# Altium PCB NB3000XN.PcbDoc (part 59 of 71)
Units mil, origin at the board's own origin, x right, y up, seen from the top; angles counter-clockwise.
Board outline 9527.56 x 6929.77 mil, 6 copper layers (Top Layer, GND+SHIELD, MidLayer1, MidLayer2, P2 - 3V3+5V0, Bottom Layer), stack 62.375 mil thick; 832 components, 1027 nets, 4655 pads, 4981 vias.
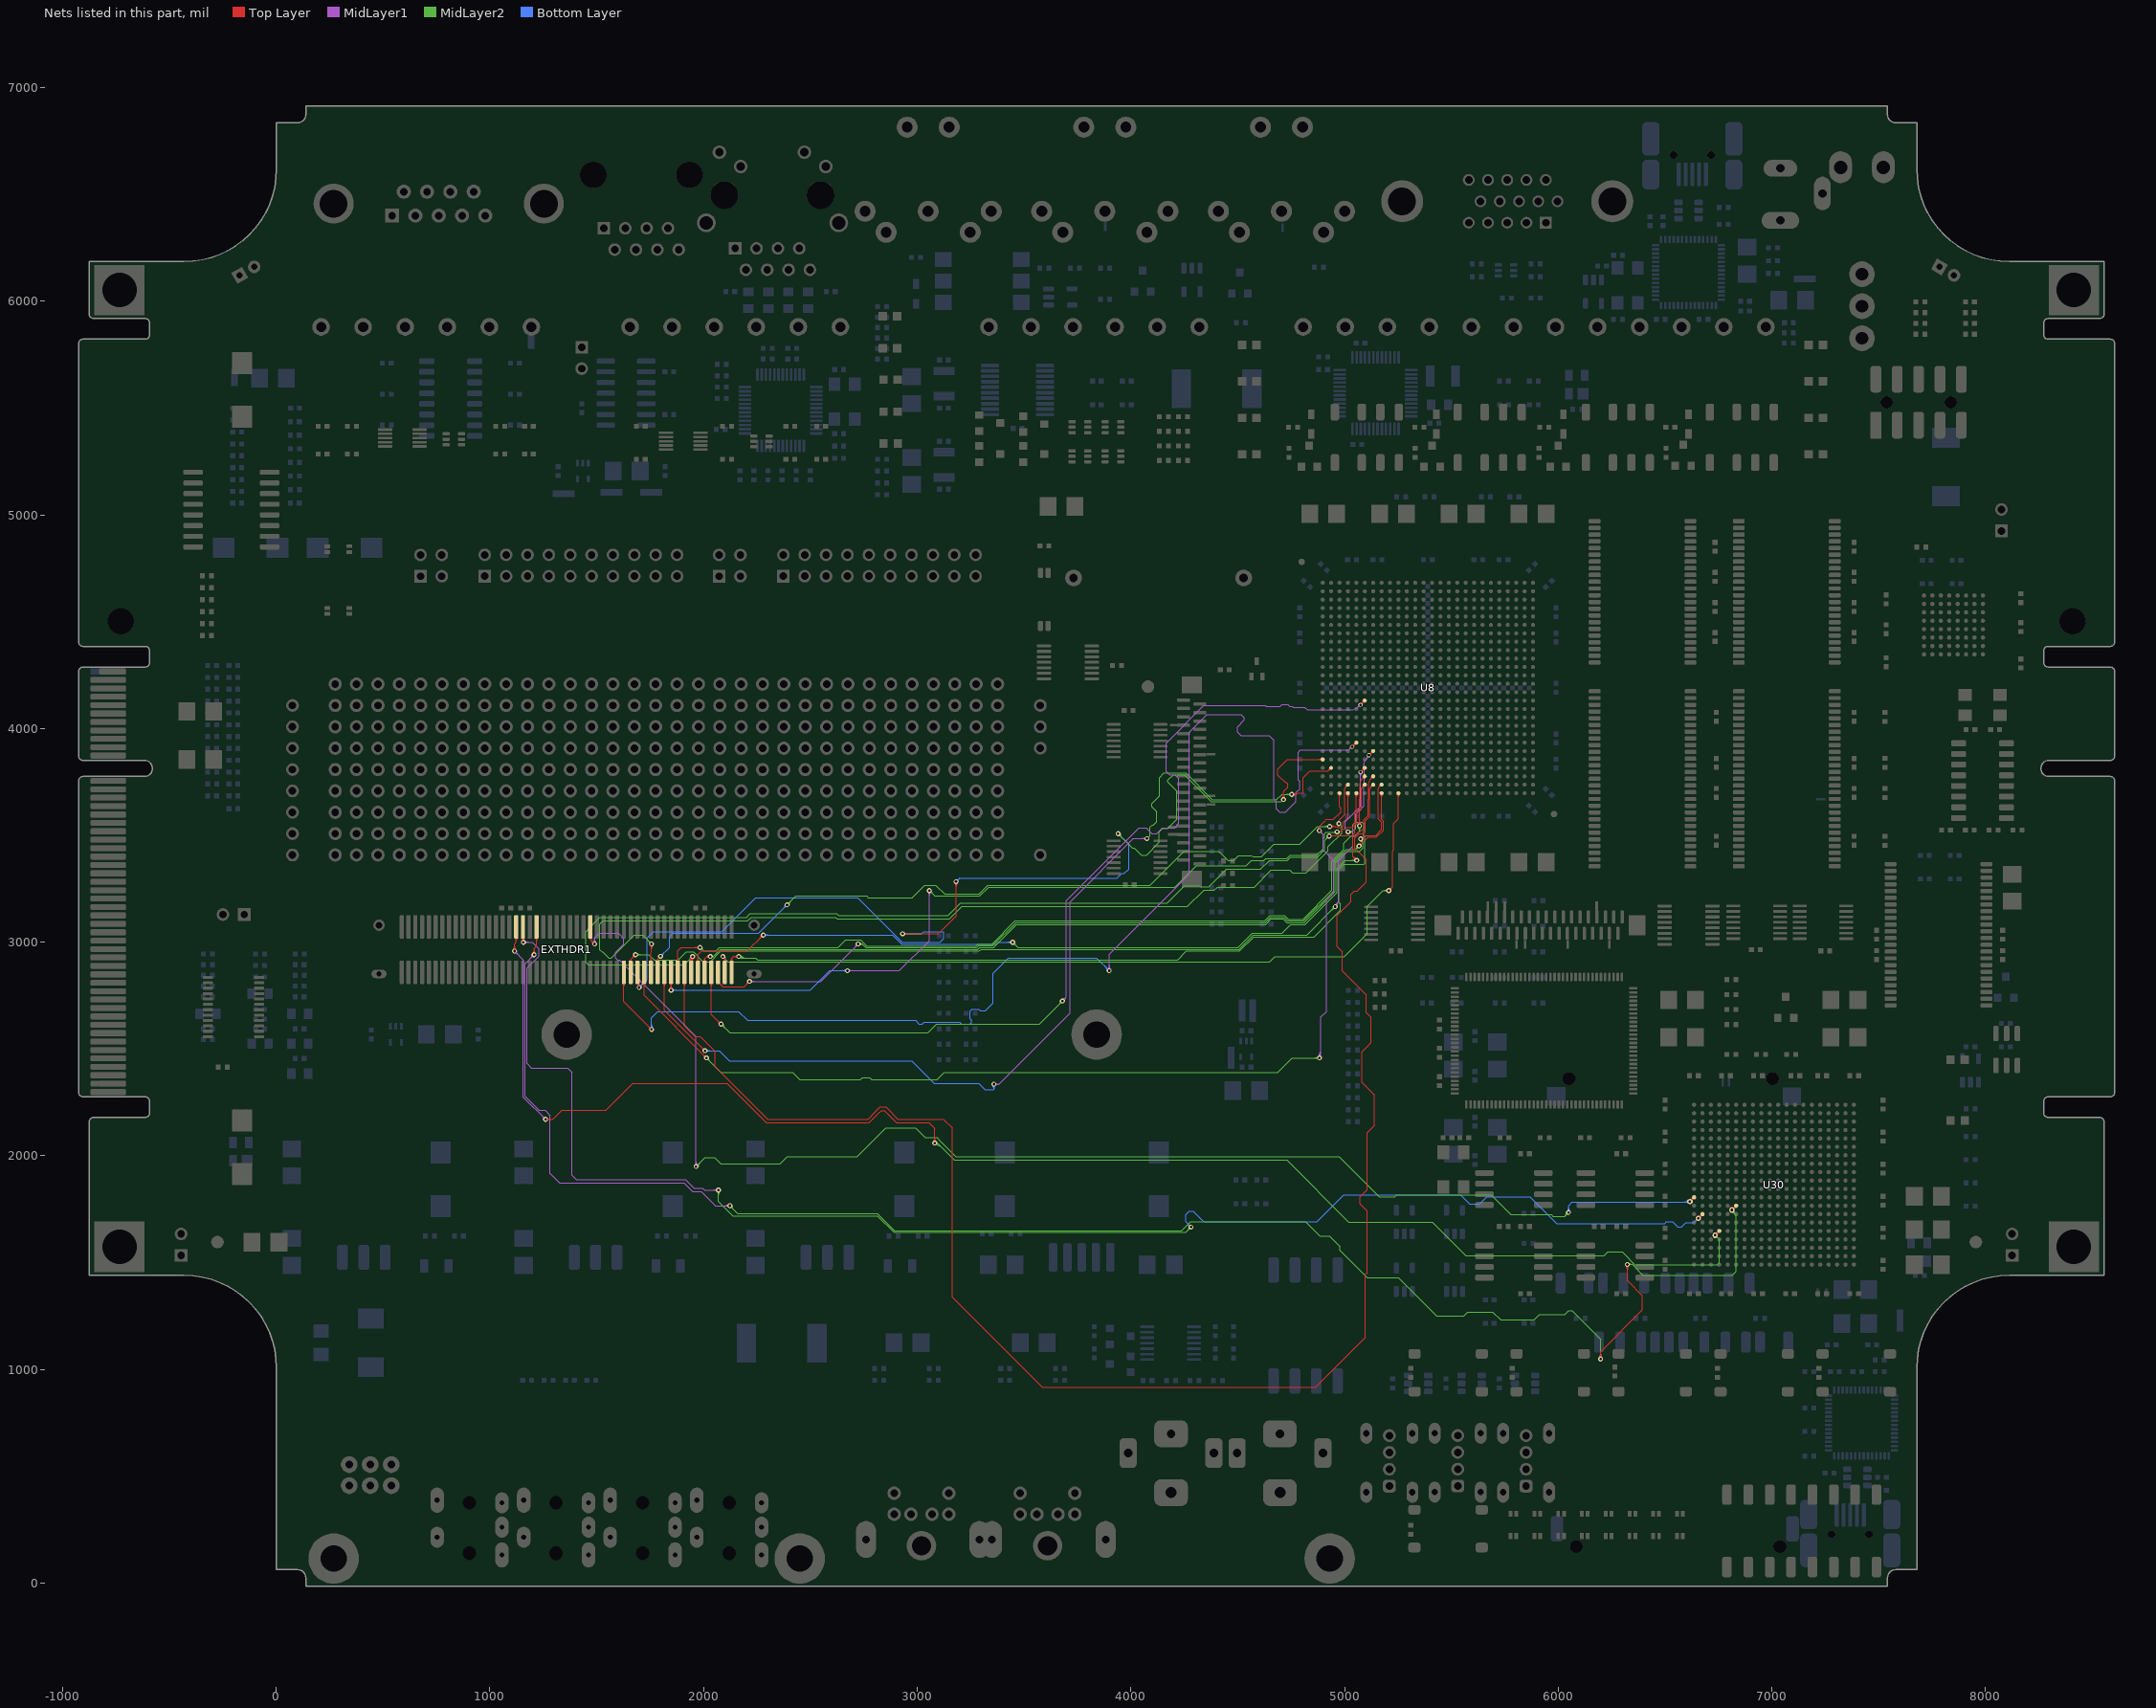
[diagram p63: the nets of this part, all layers, seen from the top]

## Via types
v1: diameter 23, hole 11.81, Top Layer to Bottom Layer, 3672 vias
v2: diameter 26, hole 11.81, Top Layer to Bottom Layer, 461 vias
v3: diameter 19, hole 11.81, Top Layer to Bottom Layer, tented both sides, 396 vias
v4: diameter 23.62, hole 11.81, Top Layer to Bottom Layer, 288 vias
v5: diameter 20, hole 11.81, Top Layer to Bottom Layer, 91 vias
v6: diameter 23, hole 11.81, Top Layer to Bottom Layer, tented both sides, 50 vias
v7: diameter 31, hole 11.81, Top Layer to Bottom Layer, 15 vias
v8: diameter 27.56, hole 11.81, Top Layer to Bottom Layer, tented both sides, 4 vias
v9: diameter 29, hole 11.81, Top Layer to Bottom Layer, 3 vias
v10: diameter 21, hole 11.81, Top Layer to Bottom Layer, 1 vias

## Nets (pads, with @x,y where several pads share a name; then routed paths per layer and width w, separated by ;. In a path a pad name is that pad's centre, name@x,y a point inside that pad or via, vN(x,y) a via of type N, cw(c..) or ccw(c..) an arc to the next point about the centre after c; other vN are vias at no path point) (continued)
PBCTRL.SPARE3: EXTHDR1.43 U30.Y12 | length 7040.8
  Top Layer w4: EXTHDR1.43@1466.36,3019.56 cw(c1460.65,3008.02) 1473.52,3008.02 ; EXTHDR1.43@1468.13,3023.14 cw(c1463.84,3014.46) 1473.52,3014.46 ; EXTHDR1.43@1469.9,3071.85 1469.91,3075.04 1473.52,3075.04 1473.52,3008.37 v1(1490.19,2991.71) ; 1473.52,3016.16 cw(c1480.48,3016.16) EXTHDR1.43@1475.56,3021.07 ; v1@1480.69,2991.71 ccw(c1457.76,2991.71) 1473.97,3007.93 ccw(c1490.19,3024.14) v1@1490.19,3001.21 ; v1@1484.69,2991.71 ccw(c1471.41,2991.71) 1480.8,3001.1 ccw(c1490.19,3010.49) v1@1490.19,2997.21
  Top Layer w8: v2(6616.3,1786.26) U30.Y12@6635.98,1805.94 ; v2@6616.3,1795.26 ccw(c6616.3,1816.99) 6631.66,1801.62 ccw(c6647.03,1786.26) v2@6625.3,1786.26 ; U30.Y12@6630.14,1805.94 cw(c6616.04,1805.94) 6626.01,1795.97 cw(c6635.98,1786) U30.Y12@6635.98,1800.1
  MidLayer1 w4: v1@1483.47,2998.43 ccw(c1467.26,3014.64) 1490.19,3014.64 ccw(c1513.13,3014.64) v1@1496.91,2998.43 ; v1@1486.3,2995.6 ccw(c1476.91,3004.99) 1490.19,3004.99 ccw(c1503.47,3004.99) v1@1494.08,2995.6 ; v1(1490.19,2991.71) 1490.19,3019 1513.19,3042 1600.6,3042 1627.39,3015.22 1627.39,2991.9 1589.19,2953.71 1589.19,2925 1597.48,2916.71 1606.86,2916.71 1965.19,2558.37 v1(1965.19,1950.04) ; v1@1958.47,1956.76 ccw(c1942.26,1972.98) 1965.19,1972.98 ccw(c1988.13,1972.98) v1@1971.91,1956.76 ; v1@1961.3,1953.93 ccw(c1951.91,1963.32) 1965.19,1963.32 ccw(c1978.47,1963.32) v1@1969.08,1953.93
  MidLayer2 w4: v1(1965.19,1950.04) 2006.86,1991.71 2052.02,1991.71 2081.73,1962 2358.27,1962 2393.08,1996.81 2719.94,1996.81 2854.13,2131 2992.56,2131 3038.06,2085.5 3092.42,2085.5 3107.36,2070.56 3181.11,1996.81 4974.77,1996.81 5163.21,1808.37 5235.45,1808.37 5243.78,1816.71 5615.19,1816.71 5687.21,1816.71 5778.88,1725.04 5967.56,1725.04 5975.9,1716.71 6030.19,1716.71 v1(6048.52,1735.04) ; v1@1965.19,1955.54 ccw(c1965.19,1968.82) 1974.58,1959.43 ccw(c1983.97,1950.04) v1@1970.69,1950.04 ; v1@1965.19,1959.54 ccw(c1965.19,1982.48) 1981.41,1966.26 ccw(c1997.63,1950.04) v1@1974.69,1950.04 ; v1@6039.02,1735.04 cw(c6016.09,1735.04) 6032.31,1718.82 cw(c6048.52,1702.61) v1@6048.52,1725.54 ; v1@6043.02,1735.04 cw(c6029.75,1735.04) 6039.13,1725.65 cw(c6048.52,1716.26) v1@6048.52,1729.54
  Bottom Layer w4: v1@6041.81,1741.76 ccw(c6025.59,1757.98) 6048.52,1757.98 ccw(c6071.46,1757.98) v1@6055.24,1741.76 ; v1@6044.64,1738.93 ccw(c6035.25,1748.32) 6048.52,1748.32 ccw(c6061.8,1748.32) v1@6052.41,1738.93 ; v1(6048.52,1735.04) 6048.52,1766.71 6065.19,1783.37 6606.86,1783.37 6615.19,1791.71 6616.3,1791.71 v2(6616.3,1786.26) ; 6582.78,1783.37 ccw(c6582.78,1819.78) v2@6608.52,1794.04 ; 6592.43,1783.37 ccw(c6592.43,1810.12) v2@6611.35,1791.21 ; 6596.71,1783.37 cw(c6596.71,1766.67) v2@6608.52,1778.48 ; 6602.09,1783.37 ccw(c6602.09,1800.47) v2@6614.18,1788.38
PBCTRL.SPARE4: EXTHDR1.65 U30.U16 | length 7661.4
  Top Layer w4: v1@1108.47,2965.09 ccw(c1092.26,2981.31) 1115.19,2981.31 ccw(c1138.13,2981.31) v1@1121.91,2965.09 ; v1@1111.3,2962.26 ccw(c1101.91,2971.65) 1115.19,2971.65 ccw(c1128.47,2971.65) v1@1119.08,2962.26 ; v1(1115.19,2958.37) 1115.19,2990.37 1123.45,2998.63 EXTHDR1.65@1123.45,3071.85 ; EXTHDR1.65@1117.79,3021.07 cw(c1104.13,3007.42) 1123.45,3007.42 cw(c1142.76,3007.42) EXTHDR1.65@1129.1,3021.07 ; v1(1260.86,2171.04) 1294.73,2171.04 1336.69,2213 1543,2213 1669,2339 2111,2339 2128.68,2321.32 2294,2156 2776.25,2156 2822.5,2202.25 2832.75,2212.5 2847.25,2212.5 2903.75,2156 3054,2156 3081.86,2128.14 v1(3081.86,2060) ; v1@1264.75,2167.15 cw(c1274.14,2157.76) 1274.14,2171.04 cw(c1274.14,2184.32) v1@1264.75,2174.93 ; v1@1267.57,2164.32 cw(c1283.79,2148.11) 1283.79,2171.04 cw(c1283.79,2193.98) v1@1267.57,2177.76 ; v1@3075.14,2066.72 ccw(c3058.92,2082.93) 3081.86,2082.93 ccw(c3104.79,2082.93) v1@3088.57,2066.72 ; v1@3077.97,2063.89 ccw(c3068.58,2073.28) 3081.86,2073.28 ccw(c3095.14,2073.28) v1@3085.75,2063.89
  Top Layer w8: v2(6734.41,1628.78) U30.U16@6754.09,1648.46 ; v2@6734.41,1637.78 ccw(c6734.41,1659.51) 6749.77,1644.14 ccw(c6765.14,1628.78) v2@6743.41,1628.78 ; U30.U16@6748.25,1648.46 cw(c6734.15,1648.46) 6744.12,1638.49 cw(c6754.09,1628.52) U30.U16@6754.09,1642.62
  MidLayer1 w4: v1@1115.19,2948.87 cw(c1115.19,2925.94) 1131.41,2942.16 cw(c1147.63,2958.37) v1@1124.69,2958.37 ; v1@1115.19,2952.87 cw(c1115.19,2939.6) 1124.58,2948.99 cw(c1133.97,2958.37) v1@1120.69,2958.37 ; v1(1115.19,2958.37) 1156.86,2916.71 1156.86,2275.04 v1(1260.86,2171.04) ; v1@1251.36,2171.04 ccw(c1228.42,2171.04) 1244.64,2187.26 ccw(c1260.86,2203.48) v1@1260.86,2180.54 ; v1@1255.36,2171.04 ccw(c1242.08,2171.04) 1251.47,2180.43 ccw(c1260.86,2189.82) v1@1260.86,2176.54
  MidLayer2 w4: v1@3081.86,2050.5 cw(c3081.86,1995.13) 3121.01,2034.28 ; v1@3081.86,2054.5 cw(c3081.86,2008.79) 3114.18,2041.11 ; v1@3081.86,2058.5 cw(c3081.86,2022.44) 3107.35,2047.94 ; v1(3081.86,2060) 3095.29,2060 3174.48,1980.81 4729.68,1980.81 5019.78,1690.71 5411.45,1690.71 5568.78,1533.37 6214.19,1533.37 6231.86,1551.04 6299.19,1551.04 6358.86,1491.37 6745.86,1491.37 6754.52,1500.04 6754.52,1608.66 v2(6734.41,1628.78) ; v1@3081.86,2062.5 cw(c3081.86,2036.1) 3100.52,2054.77 ; v1@3081.86,2066.5 cw(c3081.86,2049.76) 3093.7,2061.6
PBCTRL.SPI_CS_N0: EXTHDR1.59 U30.R13 | length 8673.8
  Top Layer w4: v1@1200.14,2948.43 ccw(c1183.92,2964.64) 1206.86,2964.64 ccw(c1229.79,2964.64) v1@1213.57,2948.43 ; v1@1202.97,2945.6 ccw(c1193.58,2954.99) 1206.86,2954.99 ccw(c1220.14,2954.99) v1@1210.75,2945.6 ; v1(1206.86,2941.71) 1206.86,2970 1217.94,2981.08 EXTHDR1.59@1217.94,3071.85 ; EXTHDR1.59@1212.28,3021.07 cw(c1198.62,3007.42) 1217.94,3007.42 cw(c1237.25,3007.42) EXTHDR1.59@1223.59,3021.07 ; v1@6191.81,1055.76 ccw(c6175.59,1071.98) 6198.52,1071.98 ccw(c6221.46,1071.98) v1@6205.24,1055.76 ; v1@6194.64,1052.93 ccw(c6185.25,1062.32) 6198.52,1062.32 ccw(c6211.8,1062.32) v1@6202.41,1052.93 ; v1(6198.52,1049.04) 6198.52,1083.37 6395,1279.85 6395,1345 6323.52,1416.48 v1(6323.52,1491.71) ; v1@6316.81,1484.99 cw(c6300.59,1468.77) 6323.52,1468.77 cw(c6346.46,1468.77) v1@6330.24,1484.99 ; v1@6319.64,1487.82 cw(c6310.25,1478.43) 6323.52,1478.43 cw(c6336.8,1478.43) v1@6327.41,1487.82
  Top Layer w8: v2(6813.15,1746.89) U30.R13@6832.83,1766.57 ; v2@6813.15,1755.89 ccw(c6813.15,1777.62) 6828.51,1762.25 ccw(c6843.88,1746.89) v2@6822.15,1746.89 ; U30.R13@6826.99,1766.57 cw(c6812.89,1766.57) 6822.86,1756.6 cw(c6832.83,1746.63) U30.R13@6832.83,1760.73
  MidLayer1 w4: v1@1197.36,2941.71 cw(c1174.42,2941.71) 1190.64,2925.49 cw(c1206.86,2909.27) v1@1206.86,2932.21 ; v1@1201.36,2941.71 cw(c1188.08,2941.71) 1197.47,2932.32 cw(c1206.86,2922.93) v1@1206.86,2936.21 ; v1(1206.86,2941.71) 1164.86,2899.71 1164.86,2278.35 1230,2213.21 1258.65,2213.21 1281.86,2190 1281.86,1916.71 1283.26,1915.3 1325.57,1873 1908.31,1873 1948.31,1833 1990.02,1833 2056.31,1766.71 v1(2123.52,1766.71) ; v1@2116.81,1759.99 ccw(c2100.59,1743.77) 2100.59,1766.71 ccw(c2100.59,1789.64) v1@2116.81,1773.43 ; v1@2119.64,1762.82 ccw(c2110.25,1753.43) 2110.25,1766.71 ccw(c2110.25,1779.99) v1@2119.64,1770.6
  MidLayer2 w4: v1@2123.52,1757.21 cw(c2123.52,1734.27) 2139.74,1750.49 cw(c2155.96,1766.71) v1@2133.02,1766.71 ; v1@2123.52,1761.21 cw(c2123.52,1747.93) 2132.91,1757.32 cw(c2142.3,1766.71) v1@2129.02,1766.71 ; v1(2123.52,1766.71) 2160.23,1730 2813.69,1730 2893.69,1650 4238.29,1650 4280,1691.71 4818.17,1691.71 4884.84,1625.04 4929.96,1625.04 4979.38,1575.62 4979.38,1557.16 5106.54,1430 5251.9,1430 5270.69,1411.21 5431.86,1250.04 5558.22,1250.04 5577.46,1269.29 5693.57,1269.29 5730.65,1232.21 5888.06,1232.21 5913.06,1257.21 6030.69,1257.21 6048.52,1275.04 6065.19,1275.04 6131.86,1208.37 6198.52,1141.71 v1(6198.52,1049.04) ; v1@6191.81,1055.76 ccw(c6175.59,1071.98) 6198.52,1071.98 ccw(c6221.46,1071.98) v1@6205.24,1055.76 ; v1@6194.64,1052.93 ccw(c6185.25,1062.32) 6198.52,1062.32 ccw(c6211.8,1062.32) v1@6202.41,1052.93 ; v1(6323.52,1491.71) 6347.21,1491.71 6397.21,1441.71 6815.52,1441.71 6832.19,1458.37 6832.19,1722.71 6813.19,1741.71 v2(6813.15,1746.89) ; v1@6327.41,1487.82 cw(c6336.8,1478.43) 6336.8,1491.71 cw(c6336.8,1504.99) v1@6327.41,1495.6 ; v1@6330.24,1484.99 cw(c6346.46,1468.77) 6346.46,1491.71 cw(c6346.46,1514.64) v1@6330.24,1498.43 ; v2@6813.15,1735.89 cw(c6813.15,1721.75) 6823.15,1731.75 ; v2@6820,1745.43 ccw(c6835.95,1742.02) 6824.41,1730.48 ; v2@6823.91,1744.59 ccw(c6844.53,1740.19) 6829.62,1725.28
PBCTRL.SPI_CS_N1: EXTHDR1.63 U30.W14 | length 7615.4
  Top Layer w4: EXTHDR1.63@1149.29,3021.07 cw(c1131.01,3002.8) v1@1156.86,3002.8 ; v1@1150.14,3006.76 ccw(c1133.92,3022.98) 1156.86,3022.98 ccw(c1179.79,3022.98) v1@1163.57,3006.76 ; EXTHDR1.63@1152.12,3023.9 cw(c1140.67,3012.45) 1156.86,3012.45 ; v1@1152.97,3003.93 ccw(c1143.58,3013.32) 1156.86,3013.32 ccw(c1170.14,3013.32) v1@1160.75,3003.93 ; EXTHDR1.63@1154.94,3071.85 1154.94,3075.04 1156.86,3075.04 v1(1156.86,3000.04) ; 1156.86,3012.04 cw(c1169.64,3012.04) EXTHDR1.63@1160.6,3021.07
  Top Layer w8: v2(6655.67,1707.52) U30.W14@6675.35,1727.2 ; v2@6655.67,1716.52 ccw(c6655.67,1738.25) 6671.03,1722.88 ccw(c6686.4,1707.52) v2@6664.67,1707.52 ; U30.W14@6669.51,1727.2 cw(c6655.41,1727.2) 6665.38,1717.23 cw(c6675.35,1707.26) U30.W14@6675.35,1721.36
  MidLayer1 w4: v1(1156.86,3000.04) 1198.52,3000.04 1230,2968.57 1230,2935 1172.86,2877.86 1172.86,2432.14 1195,2410 1365,2410 1385,2390 1385,1908.21 1404.21,1889 1914.94,1889 1954.94,1849 1996.65,1849 2005.65,1840 v1(2070,1840) ; v1@1160.75,2996.15 cw(c1170.14,2986.76) 1170.14,3000.04 cw(c1170.14,3013.32) v1@1160.75,3003.93 ; v1@1163.57,2993.32 cw(c1179.79,2977.11) 1179.79,3000.04 cw(c1179.79,3022.98) v1@1163.57,3006.76 ; v1@2063.28,1833.28 ccw(c2047.06,1817.06) 2047.06,1840 ccw(c2047.06,1862.93) v1@2063.28,1846.72 ; v1@2066.11,1836.11 ccw(c2056.72,1826.72) 2056.72,1840 ccw(c2056.72,1853.28) v1@2066.11,1843.89
  MidLayer2 w4: v1@2063.28,1833.28 cw(c2047.06,1817.06) 2070,1817.06 cw(c2092.93,1817.06) v1@2076.72,1833.28 ; v1@2066.11,1836.11 cw(c2056.72,1826.72) 2070,1826.72 cw(c2083.28,1826.72) v1@2073.89,1836.11 ; v1(2070,1840) 2070,1786.9 2137.81,1719.09 2813.28,1719.09 2890.66,1641.71 4256.86,1641.71 v1(4281.86,1666.71) ; v1@4272.36,1666.71 cw(c4249.42,1666.71) 4265.64,1650.49 cw(c4281.86,1634.27) v1@4281.86,1657.21 ; v1@4276.36,1666.71 cw(c4263.08,1666.71) 4272.47,1657.32 cw(c4281.86,1647.93) v1@4281.86,1661.21
  Bottom Layer w4: v1@4272.36,1666.71 ccw(c4249.42,1666.71) 4265.64,1682.93 ccw(c4281.86,1699.14) v1@4281.86,1676.21 ; v1@4276.36,1666.71 ccw(c4263.08,1666.71) 4272.47,1676.1 ccw(c4281.86,1685.49) v1@4281.86,1672.21 ; v1(4281.86,1666.71) 4256.86,1691.71 4256.86,1725.04 4273.52,1741.71 4290.19,1741.71 4340.19,1691.71 4870.54,1691.71 4995.54,1816.71 5543.33,1816.71 5585,1775.04 5631.86,1775.04 5665.19,1808.37 5867.94,1808.37 5992.94,1683.37 6498.52,1683.37 6506.86,1691.71 6535,1691.71 6560,1666.71 6576.86,1666.71 6598.52,1688.37 6636.52,1688.37 v2(6655.67,1707.52)
PBIO.D0: EXTHDR1.2 U8.AC6 | length 4422.7
  Top Layer w4: EXTHDR1.2@2125.66,2910.03 ccw(c2112.01,2923.68) 2131.32,2923.68 ccw(c2150.64,2923.68) EXTHDR1.2@2136.98,2910.03 ; EXTHDR1.2@2131.32,2859.25 2131.32,2926.32 2138.37,2933.37 v1(2165.19,2933.37) ; v1@2158.47,2926.66 ccw(c2142.26,2910.44) 2142.26,2933.37 ccw(c2142.26,2956.31) v1@2158.47,2940.09 ; v1@2161.3,2929.49 ccw(c2151.91,2920.1) 2151.91,2933.37 ccw(c2151.91,2946.65) v1@2161.3,2937.26 ; v3(5075.04,3796.3) U8.AC6@5094.72,3815.98 ; U8.AC6@5087.22,3815.98 cw(c5069.12,3815.98) 5081.92,3803.18 cw(c5094.72,3790.38) U8.AC6@5094.72,3808.48 ; U8.AC6@5087.38,3815.98 cw(c5069.66,3815.98) 5082.19,3803.45 cw(c5094.72,3790.92) U8.AC6@5094.72,3808.64 ; 5087.84,3809.1 ccw(c5100.65,3796.3) 5082.54,3796.3 cw(c5100.65,3796.3) 5087.84,3809.1 ; 5087.84,3809.1 cw(c5075.04,3821.91) 5075.04,3803.8 ccw(c5075.04,3821.91) 5087.84,3809.1
  MidLayer1 w4: v1(5016.86,3516.71) 5003.86,3529.71 5003.86,3563.71 5064.86,3624.71 5075.04,3634.89 5075.04,3660 5075.04,3670 5075.04,3718.62 v3(5075.04,3796.3) ; v3@5069.85,3791.11 cw(c5057.31,3778.57) 5075.04,3778.57 cw(c5092.77,3778.57) v3@5080.23,3791.11 ; 5075.04,3778.19 cw(c5093.15,3778.19) 5080.34,3791 ccw(c5093.15,3778.19) 5075.04,3778.19 ; 5075.04,3778.19 ccw(c5056.93,3778.19) 5069.74,3791 cw(c5056.93,3778.19) 5075.04,3778.19
  MidLayer2 w4: v1@2163.42,2931.61 ccw(c2179.27,2947.46) 2179.27,2925.04 ; v1(2165.19,2933.37) 2173.52,2925.04 2245,2925.04 2253.67,2916.37 4218.63,2916.37 4260.63,2958.37 4508.86,2958.37 4575.52,3025.04 4857.86,3025.04 4981.86,3149.04 4981.86,3178.14 4973.52,3186.48 ; v1@2166.25,2934.44 ccw(c2188.93,2957.12) 2188.93,2925.04 ; v1@2169.08,2937.26 ccw(c2198.59,2966.77) 2198.59,2925.04 ; v1@2171.91,2940.09 ccw(c2208.25,2976.43) 2208.25,2925.04 ; 4980,3180 4973.52,3186.48 ; v1(5016.86,3516.71) 5034.86,3516.71 ; v1@5024.7,3511.35 cw(c5034.86,3504.41) 5034.86,3516.71 ; v1@5024.7,3522.07 ccw(c5034.86,3529.01) 5034.86,3516.71 ; 4973.52,3186.48 4973.52,3341.71 4997.52,3365.71 5090.19,3365.71 5094.52,3370.04 5094.52,3491.71 5090.19,3496.04 5090.19,3554.37 5081.86,3562.71 5061.19,3562.71 5051.52,3553.04 5051.52,3533.37 5034.86,3516.71
PBIO.D1: EXTHDR1.4 U8.AF10 | length 4178.1
  Top Layer w4: v1(2090.19,2933.37) 2099.83,2923.74 EXTHDR1.4@2099.83,2859.25 ; EXTHDR1.4@2094.17,2910.03 ccw(c2080.51,2923.68) 2099.83,2923.68 ccw(c2119.14,2923.68) EXTHDR1.4@2105.48,2910.03 ; v1(5206.86,3241.71) 5224.19,3259.04 5224.19,3425.5 5230.02,3431.34 5230.02,3555.94 5252.2,3578.12 5252.2,3660 5252.2,3670 U8.AF10@5252.2,3697.87 ; v1@5206.86,3247.21 ccw(c5206.86,3260.49) 5216.25,3251.1 ccw(c5225.64,3241.71) v1@5212.36,3241.71 ; v1@5206.86,3251.21 ccw(c5206.86,3274.14) 5223.07,3257.93 ccw(c5239.29,3241.71) v1@5216.36,3241.71 ; U8.AF10@5246.9,3692.57 cw(c5234.1,3679.77) 5252.2,3679.77 cw(c5270.31,3679.77) U8.AF10@5257.51,3692.57 ; 5252.2,3680.15 cw(c5269.93,3680.15) 5257.4,3692.68 ccw(c5269.93,3680.15) 5252.2,3680.15 ; 5252.2,3680.15 ccw(c5234.48,3680.15) 5247.01,3692.68 cw(c5234.48,3680.15) 5252.2,3680.15
  MidLayer2 w4: v1@2090.19,2923.87 cw(c2090.19,2900.94) 2106.41,2917.16 cw(c2122.63,2933.37) v1@2099.69,2933.37 ; v1@2090.19,2927.87 cw(c2090.19,2914.6) 2099.58,2923.99 cw(c2108.97,2933.37) v1@2095.69,2933.37 ; v1(2090.19,2933.37) 2115.19,2908.37 4648.52,2908.37 4673.52,2933.37 4999.52,2933.37 5106.86,3040.71 5106.86,3168.35 5180.21,3241.71 v1(5206.86,3241.71) ; v1@5200.14,3234.99 ccw(c5183.92,3218.77) 5183.92,3241.71 ccw(c5183.92,3264.64) v1@5200.14,3248.43 ; v1@5202.97,3237.82 ccw(c5193.58,3228.43) 5193.58,3241.71 ccw(c5193.58,3254.99) v1@5202.97,3245.6
PBIO.D2: EXTHDR1.6 U8.AF8 | length 4162.4
  Top Layer w4: EXTHDR1.6@2068.33,2806.13 cw(c2068.33,2788.18) 2081.02,2800.87 ; EXTHDR1.6@2068.33,2859.25 2068.33,2813.57 2090.19,2791.71 2190.19,2791.71 v1(2215.19,2816.71) ; EXTHDR1.6@2072.33,2814.13 ccw(c2083.35,2814.13) EXTHDR1.6@2075.56,2806.34 ; EXTHDR1.6@2076.33,2814.13 ccw(c2097.01,2814.13) 2082.39,2799.51 ; v1@2205.69,2816.71 cw(c2182.76,2816.71) 2198.97,2800.49 cw(c2215.19,2784.27) v1@2215.19,2807.21 ; v1@2209.69,2816.71 cw(c2196.41,2816.71) 2205.8,2807.32 cw(c2215.19,2797.93) v1@2215.19,2811.21 ; v1(5068.52,3450.37) 5109.86,3491.71 5149.21,3491.71 5182.02,3524.52 5182.02,3567.22 5173.46,3575.78 5173.46,3660 5173.46,3670 U8.AF8@5173.46,3697.87 ; v1@5068.52,3455.87 ccw(c5068.52,3469.15) 5077.91,3459.76 ccw(c5087.3,3450.37) v1@5074.02,3450.37 ; v1@5068.52,3459.87 ccw(c5068.52,3482.81) 5084.74,3466.59 ccw(c5100.96,3450.37) v1@5078.02,3450.37 ; U8.AF8@5168.16,3692.57 cw(c5155.36,3679.77) 5173.46,3679.77 cw(c5191.57,3679.77) U8.AF8@5178.77,3692.57 ; U8.AF8@5168.27,3692.68 cw(c5155.74,3680.15) 5173.46,3680.15 cw(c5191.19,3680.15) U8.AF8@5178.66,3692.68
  MidLayer1 w4: v1(2215.19,2816.71) 2548.52,2816.71 v1(2723.52,2991.71) ; v1@2219.08,2812.82 cw(c2228.47,2803.43) 2228.47,2816.71 cw(c2228.47,2829.99) v1@2219.08,2820.6 ; v1@2221.91,2809.99 cw(c2238.13,2793.77) 2238.13,2816.71 cw(c2238.13,2839.64) v1@2221.91,2823.43 ; v1@2714.02,2991.71 cw(c2691.09,2991.71) 2707.31,2975.49 cw(c2723.52,2959.27) v1@2723.52,2982.21 ; v1@2718.02,2991.71 cw(c2704.75,2991.71) 2714.14,2982.32 cw(c2723.52,2972.93) v1@2723.52,2986.21
  MidLayer2 w4: v1(2723.52,2991.71) 2742.71,2991.71 ; v1@2731.08,2985.95 cw(c2742.71,2977.09) 2742.71,2991.71 ; v1@2731.08,2997.47 ccw(c2742.71,3006.32) 2742.71,2991.71 ; v1@5059.02,3450.37 cw(c5036.09,3450.37) 5052.31,3434.16 cw(c5068.52,3417.94) v1@5068.52,3440.87 ; v1@5063.02,3450.37 cw(c5049.75,3450.37) 5059.14,3440.99 cw(c5068.52,3431.6) v1@5068.52,3444.87 ; v1(5068.52,3450.37) 5051.52,3433.37 5006.86,3433.37 4948.86,3375.37 4948.86,3240.35 4808.54,3100.04 4732.86,3100.04 4716.19,3116.71 4654.21,3116.71 4629.21,3091.71 3462.21,3091.71 3353.54,2983.04 3288.04,2983.04 3279.71,2974.71 2759.71,2974.71 2742.71,2991.71
PBIO.D3: EXTHDR1.8 U8.R6 | length 4956.4
  Top Layer w4: EXTHDR1.8@2031.18,2808.48 cw(c2017.52,2794.82) 2036.83,2794.82 cw(c2056.15,2794.82) EXTHDR1.8@2042.49,2808.48 ; EXTHDR1.8@2036.83,2859.25 2036.83,2661.73 v1(2081.86,2616.71) ; v1@2072.36,2616.71 ccw(c2049.42,2616.71) 2065.64,2632.93 ccw(c2081.86,2649.14) v1@2081.86,2626.21 ; v1@2076.36,2616.71 ccw(c2063.08,2616.71) 2072.47,2626.1 ccw(c2081.86,2635.49) v1@2081.86,2622.21 ; v3(5075.04,4111.26) U8.R6@5094.72,4130.94 ; U8.R6@5087.22,4130.94 cw(c5069.12,4130.94) 5081.92,4118.14 cw(c5094.72,4105.34) U8.R6@5094.72,4123.44 ; U8.R6@5087.38,4130.94 cw(c5069.66,4130.94) 5082.19,4118.41 cw(c5094.72,4105.88) U8.R6@5094.72,4123.6 ; 5087.84,4124.06 cw(c5075.04,4136.87) 5075.04,4118.76 ccw(c5075.04,4136.87) 5087.84,4124.06 ; 5087.84,4124.06 ccw(c5100.65,4111.26) 5082.54,4111.26 cw(c5100.65,4111.26) 5087.84,4124.06
  MidLayer1 w4: v1(3680,2725) 3698.52,2743.52 3698.52,3194.69 4038.84,3535 4071.9,3535 4098.52,3508.37 4120.54,3508.37 4148.17,3536 4203.52,3536 4224.19,3556.67 4224.19,3766.39 4206.88,3783.71 4181.48,3783.71 4165,3800.19 4165,3820 ; v1@3680,2730.5 ccw(c3680,2743.78) 3689.39,2734.39 ccw(c3698.78,2725) v1@3685.5,2725 ; v1@3680,2734.5 ccw(c3680,2757.43) 3696.22,2741.22 ccw(c3712.43,2725) v1@3689.5,2725 ; 4165.19,3820 4165.19,3932.43 4340.47,4107.71 4630.15,4107.71 4634.15,4103.71 4699.08,4103.71 4707.29,4111.92 4735.3,4111.92 4743.51,4103.71 4756.15,4103.71 4759.82,4100.04 4812.82,4100.04 4825.46,4087.4 4860,4087.4 4870,4087.4 4918.62,4087.4 4938.04,4087.4 5012.16,4087.4 ; 4998.23,4087.4 5012.16,4087.4 ; v3@5067.57,4111.91 cw(c5049.53,4113.49) 5061.17,4099.62 ; v3@5074.39,4103.79 ccw(c5072.81,4085.75) 5061.17,4099.62 ; 5012.16,4087.4 5031.66,4087.4 ccw(c5031.66,4129.13) 5061.17,4099.62
  MidLayer2 w4: v1@2081.86,2607.21 cw(c2081.86,2584.27) 2098.07,2600.49 cw(c2114.29,2616.71) v1@2091.36,2616.71 ; v1@2081.86,2611.21 cw(c2081.86,2597.93) 2091.25,2607.32 cw(c2100.64,2616.71) v1@2087.36,2616.71 ; v1(2081.86,2616.71) 2122.56,2576 3049.65,2576 3090.35,2616.71 3559.84,2616.71 3571.71,2616.71 v1(3680,2725) ; v1@3670.5,2725 cw(c3647.56,2725) 3663.78,2708.78 cw(c3680,2692.56) v1@3680,2715.5 ; v1@3674.5,2725 cw(c3661.22,2725) 3670.61,2715.61 cw(c3680,2706.22) v1@3680,2719.5
PBIO.D4: EXTHDR1.10 U8.AE8 | length 4038.7
  Top Layer w4: EXTHDR1.10@1999.72,2910.06 ccw(c1986.41,2923.52) 2005.34,2923.52 ; EXTHDR1.10@2005.34,2904.36 EXTHDR1.10@2005.34,2859.25 2005.34,2923.52 ; EXTHDR1.10@2010.96,2910.06 cw(c2024.27,2923.52) 2005.34,2923.52 ; v1@2023.68,2928.53 ccw(c2015.19,2923.51) 2015.19,2933.37 ; v1@2023.68,2938.22 cw(c2015.19,2943.24) 2015.19,2933.37 ; v1(2031.86,2933.37) 2015.19,2933.37 ; v1(5075.52,3483.37) 5092.19,3500.04 5146.23,3500.04 5174.02,3527.84 5174.02,3561.21 5168.52,3566.71 5165.19,3570.04 5157.96,3577.27 5157.96,3660 5157.96,3670 5157.96,3717.53 cw(c5168.11,3717.53) 5160.93,3724.71 ; v1@5075.52,3488.87 ccw(c5075.52,3502.15) 5084.91,3492.76 ccw(c5094.3,3483.37) v1@5081.02,3483.37 ; v1@5075.52,3492.87 ccw(c5075.52,3515.81) 5091.74,3499.59 ccw(c5107.96,3483.37) v1@5085.02,3483.37 ; U8.AE8@5166.12,3737.24 cw(c5148.4,3737.24) 5160.93,3724.71 ; U8.AE8@5173.46,3729.9 ccw(c5173.46,3712.17) 5160.93,3724.71 ; 2005.34,2923.52 2015.19,2933.37 ; 2005.34,2923.52 2015.19,2933.37
  MidLayer2 w4: v1(2031.86,2933.37) 2045.19,2933.37 2078.52,2966.71 2960,2966.71 3048.52,2966.71 3283.29,2966.71 3291.63,2975.04 3356.86,2975.04 3465.19,3083.37 4632.19,3083.37 4657.19,3108.37 4712.52,3108.37 4729.19,3091.71 4811.52,3091.71 4956.86,3237.04 4956.86,3372.06 5009.84,3425.04 5040,3425.04 5069.86,3425.04 5086.52,3441.71 5086.52,3466.71 5075.52,3477.71 v1(5075.52,3483.37) ; v1@5075.52,3473.87 cw(c5075.52,3464.62) 5082.07,3471.16 ; v1@5079.92,3480.07 ccw(c5084.36,3476.73) 5080.43,3472.8 ; v1@5083.12,3477.67 ccw(c5088.08,3473.93) 5083.69,3469.54
PBIO.D5: EXTHDR1.12 U8.AD7 | length 4431.8
  Top Layer w4: EXTHDR1.12@1968.19,2910.03 ccw(c1954.53,2923.68) 1973.84,2923.68 ccw(c1993.16,2923.68) EXTHDR1.12@1979.5,2910.03 ; EXTHDR1.12@1973.84,2859.25 1973.84,2941.69 1990.52,2958.37 2204.52,2958.37 v1(2279.52,3033.37) ; v1@2270.02,3033.37 cw(c2247.09,3033.37) 2263.31,3017.16 cw(c2279.52,3000.94) v1@2279.52,3023.87 ; v1@2274.02,3033.37 cw(c2260.75,3033.37) 2270.14,3023.99 cw(c2279.52,3014.6) v1@2279.52,3027.87 ; v1@5047.36,3383.37 ccw(c5024.42,3383.37) 5040.64,3399.59 ccw(c5056.86,3415.81) v1@5056.86,3392.87 ; v1@5051.36,3383.37 ccw(c5038.08,3383.37) 5047.47,3392.76 ccw(c5056.86,3402.15) v1@5056.86,3388.87 ; v1(5056.86,3383.37) 5040.19,3400.04 5040.19,3491.71 5065.19,3516.71 5073.52,3516.71 5090.19,3533.37 5090.19,3573.71 5110.23,3593.75 5110.23,3660 5110.23,3670 5110.23,3736.73 ; 5110.23,3736.73 cw(c5148.91,3736.73) 5121.56,3764.08 ; 5110.23,3736.73 cw(c5148.91,3736.73) 5121.56,3764.08 ; 5121.56,3764.08 ccw(c5109.03,3776.61) 5126.75,3776.61 cw(c5109.03,3776.61) 5121.56,3764.08 ; 5121.56,3764.08 cw(c5134.09,3751.55) 5134.09,3769.27 ccw(c5134.09,3751.55) 5121.56,3764.08
  MidLayer2 w4: 3463.52,2983.37 v1(3446.86,3000.04) 3472.19,2974.71 4502.56,2974.71 4569.56,3041.71 4706.86,3041.71 4748.52,3083.37 4815.19,3083.37 4965.19,3233.37 4965.19,3344.71 5003.86,3383.37 v1(5056.86,3383.37) ; v1@5050.14,3376.66 ccw(c5033.92,3360.44) 5033.92,3383.37 ccw(c5033.92,3406.31) v1@5050.14,3390.09 ; v1@5052.97,3379.49 ccw(c5043.58,3370.1) 5043.58,3383.37 ccw(c5043.58,3396.65) v1@5052.97,3387.26 ; 3456.25,2990.65 cw(c3465.64,3000.04) 3452.36,3000.04 ccw(c3465.64,3000.04) 3456.25,2990.65 ; 3456.25,2990.65 ccw(c3446.86,2981.26) 3446.86,2994.54 cw(c3446.86,2981.26) 3456.25,2990.65 ; 3463.07,2983.82 cw(c3479.29,3000.04) 3456.36,3000.04 ccw(c3479.29,3000.04) 3463.08,2983.82 ; 3463.07,2983.82 ccw(c3446.86,2967.61) 3446.86,2990.54 cw(c3446.86,2967.61) 3463.08,2983.82
  Bottom Layer w4: v1(2279.52,3033.37) 2825,3033.37 2840.19,3033.37 2885.71,3033.37 2927.37,2991.71 2940,2991.71 3370,2991.71 3378.33,3000.04 v1(3446.86,3000.04) ; v1@2283.41,3029.49 cw(c2292.8,3020.1) 2292.8,3033.37 cw(c2292.8,3046.65) v1@2283.41,3037.26 ; v1@2286.24,3026.66 cw(c2302.46,3010.44) 2302.46,3033.37 cw(c2302.46,3056.31) v1@2286.24,3040.09 ; v1@3440.14,2993.32 ccw(c3423.92,2977.11) 3423.92,3000.04 ccw(c3423.92,3022.98) v1@3440.14,3006.76 ; v1@3442.97,2996.15 ccw(c3433.58,2986.76) 3433.58,3000.04 ccw(c3433.58,3013.32) v1@3442.97,3003.93
PBIO.D6: EXTHDR1.14 U8.AD6 | length 5166.2
  Top Layer w4: EXTHDR1.14@1936.69,2910.03 ccw(c1928.24,2918.48) 1940.19,2918.48 ; EXTHDR1.14@1940.19,2883.37 1940.19,2925.04 ; EXTHDR1.14@1940.19,2890.32 cw(c1991.58,2890.32) v1@1955.24,2926.66 ; EXTHDR1.14@1940.19,2899.98 cw(c1981.92,2899.98) v1@1952.41,2929.49 ; EXTHDR1.14@1940.19,2909.63 cw(c1972.27,2909.63) v1@1949.58,2932.31 ; 1940.19,2916.9 ccw(c1952.02,2916.9) EXTHDR1.14@1944.79,2907.53 ; 1940.19,2919.29 cw(c1962.61,2919.29) v1@1946.76,2935.14 ; EXTHDR1.14@1947.24,2910.7 cw(c1958.31,2925.04) 1940.19,2925.04 ; v1(1948.52,2933.37) 1940.19,2925.04 ; v1(4928.52,3496.71) 4931.86,3493.37 4935.19,3493.37 4940.19,3498.37 5035.54,3498.37 5049.19,3512.02 5049.19,3538 5049.19,3548.79 5058,3557.6 5058,3559.52 5058,3574 5058,3612.5 5070.86,3625.36 5070.86,3660 5070.86,3670 5070.86,3736.73 ; 5070.86,3736.73 cw(c5109.54,3736.73) 5082.19,3764.08 ; 5070.86,3736.73 cw(c5109.54,3736.73) 5082.19,3764.08 ; 5082.19,3764.08 ccw(c5069.66,3776.61) 5087.38,3776.61 cw(c5069.66,3776.61) 5082.19,3764.08 ; 5082.19,3764.08 cw(c5094.72,3751.55) 5094.72,3769.27 ccw(c5094.72,3751.55) 5082.19,3764.08
  MidLayer2 w4: v1@1939.02,2933.37 cw(c1916.09,2933.37) 1932.31,2917.16 cw(c1948.52,2900.94) v1@1948.52,2923.87 ; v1@1943.02,2933.37 cw(c1929.75,2933.37) 1939.14,2923.99 cw(c1948.52,2914.6) v1@1948.52,2927.87 ; v1(1948.52,2933.37) 1909.15,2894 1461,2894 1448.52,2906.48 1448.52,3050.04 1515.19,3116.71 2200.9,3116.71 2217.56,3133.37 2623.52,3133.37 2631.86,3125.04 3145.54,3125.04 3203.88,3183.37 4169.82,3183.37 4251.44,3265 4280.15,3265 4321.21,3265 4326.84,3259.37 4365.19,3259.37 4447.52,3341.71 4606.86,3341.71 4648.52,3383.37 4732.86,3383.37 4748.52,3399.04 4873.19,3399.04 4907.52,3433.37 4907.52,3475.71 v1(4928.52,3496.71) ; v1@4919.02,3496.71 cw(c4896.09,3496.71) 4912.31,3480.49 cw(c4928.52,3464.27) v1@4928.52,3487.21 ; v1@4923.02,3496.71 cw(c4909.75,3496.71) 4919.14,3487.32 cw(c4928.52,3477.93) v1@4928.52,3491.21
PBIO.D7: EXTHDR1.16 U8.AE7 | length 8412.2
  Top Layer w4: EXTHDR1.16@1905.19,2808.48 cw(c1891.54,2794.82) 1910.85,2794.82 cw(c1930.16,2794.82) EXTHDR1.16@1916.51,2808.48 ; EXTHDR1.16@1910.85,2859.25 1910.85,2608.37 1960.85,2558.37 1985,2558.37 2054.4,2488.97 2054.4,2418.22 2300.63,2172 2345,2172 2769.62,2172 2806.5,2208.88 2826.12,2228.5 2853.88,2228.5 2910.38,2172 3123,2172 3165.19,2129.81 3165.19,1337.04 ; 3165.19,1990 3165.19,1337.04 ; 3165.19,1337.04 3585.86,916.37 4864.86,916.37 5098.52,1150.04 5098.52,1444.69 5106.86,1453.02 5106.86,1741.71 5073.52,1775.04 5073.52,1808.37 5106.86,1841.71 5106.86,2108.37 5140,2141.52 5140,2285.94 5082.02,2343.91 5082.02,2487.02 5123.69,2528.69 5123.69,2648.95 5102.5,2670.14 5102.5,2753.48 5088.77,2767.21 5088.67,2767.21 4990.19,2865.68 4990.19,2955.04 4965.19,2980.04 4965.19,3125.04 5031.19,3191.04 5031.19,3224.37 ; 5031.19,3224.37 5045.52,3238.71 ; 5031.19,3224.37 5045.52,3238.71 ; 5045.52,3238.71 5059.21,3238.71 5102.86,3282.35 5102.86,3287.71 5102.86,3300 5102.86,3387.37 5048.52,3441.71 5048.52,3488.73 5068.17,3508.37 5089.19,3508.37 5098.52,3517.71 5098.52,3569.37 5118.59,3589.44 5118.59,3655.26 5118.59,3660 5118.59,3670 5118.59,3717.53 ; 5118.59,3717.53 cw(c5128.74,3717.53) 5121.56,3724.71 ; 5118.59,3717.53 cw(c5128.74,3717.53) 5121.56,3724.71 ; 5121.56,3724.71 cw(c5134.09,3712.17) 5134.09,3729.9 ccw(c5134.09,3712.17) 5121.56,3724.71 ; 5121.56,3724.71 ccw(c5109.03,3737.24) 5126.75,3737.24 cw(c5109.03,3737.24) 5121.56,3724.71
PBIO.D8: EXTHDR1.18 U8.AE6 | length 4204
  Top Layer w4: EXTHDR1.18@1873.7,2910.03 ccw(c1860.04,2923.68) 1879.35,2923.68 ccw(c1898.67,2923.68) EXTHDR1.18@1885.01,2910.03 ; EXTHDR1.18@1879.35,2859.25 1879.35,2958.37 1896.02,2975.04 v1(1983.52,2975.04) ; v1@1976.81,2968.32 ccw(c1960.59,2952.11) 1960.59,2975.04 ccw(c1960.59,2997.98) v1@1976.81,2981.76 ; v1@1979.64,2971.15 ccw(c1970.25,2961.76) 1970.25,2975.04 ccw(c1970.25,2988.32) v1@1979.64,2978.93 ; v1@5063.47,3551.76 ccw(c5047.26,3567.98) 5070.19,3567.98 ccw(c5093.13,3567.98) v1@5076.91,3551.76 ; v1@5066.3,3548.93 ccw(c5056.91,3558.32) 5070.19,3558.32 ccw(c5083.47,3558.32) v1@5074.08,3548.93 ; v1(5070.19,3545.04) 5070.19,3613.37 5079.22,3622.4 5079.22,3655.26 5079.22,3660 5079.22,3670 5079.22,3717.53 ; 5079.22,3717.53 cw(c5089.37,3717.53) 5082.19,3724.71 ; 5079.22,3717.53 cw(c5089.37,3717.53) 5082.19,3724.71 ; 5082.19,3724.71 cw(c5094.72,3712.17) 5094.72,3729.9 ccw(c5094.72,3712.17) 5082.19,3724.71 ; 5082.19,3724.71 ccw(c5069.66,3737.24) 5087.38,3737.24 cw(c5069.66,3737.24) 5082.19,3724.71
  MidLayer2 w4: v1@1983.52,2965.54 cw(c1983.52,2942.61) 1999.74,2958.82 cw(c2015.96,2975.04) v1@1993.02,2975.04 ; v1@1983.52,2969.54 cw(c1983.52,2956.26) 1992.91,2965.65 cw(c2002.3,2975.04) v1@1989.02,2975.04 ; v1(1983.52,2975.04) 2000.19,2958.37 2057.86,2958.37 2074.52,2975.04 2630.04,2975.04 2665,3010 2735.73,3010 2763.02,2982.71 3274.33,2982.71 3282.67,2991.04 3350.23,2991.04 3459.23,3100.04 4626.23,3100.04 4651.19,3125 4719.13,3125 4719.17,3125.04 4736.17,3108.04 4805.23,3108.04 4940.86,3243.67 4940.86,3295 ; 4940.86,3299.37 4940.86,3295 ; v1@5063.47,3538.32 cw(c5047.26,3522.11) 5070.19,3522.11 cw(c5093.13,3522.11) v1@5076.91,3538.32 ; v1@5066.3,3541.15 cw(c5056.91,3531.76) 5070.19,3531.76 cw(c5083.47,3531.76) v1@5074.08,3541.15 ; v1(5070.19,3545.04) 5070.19,3520.19 5047.2,3497.2 5030.68,3497.2 4996.86,3463.37 4996.86,3434.69 4940.86,3378.69 4940.86,3295
PBIO.D9: EXTHDR1.20 U8.AF5 | length 4401.1
  Top Layer w4: v1@1841.14,2781.76 ccw(c1824.92,2797.98) 1847.86,2797.98 ccw(c1870.79,2797.98) v1@1854.57,2781.76 ; EXTHDR1.20@1842.2,2808.48 cw(c1828.55,2794.82) 1847.86,2794.82 cw(c1867.17,2794.82) EXTHDR1.20@1853.51,2808.48 ; v1@1843.97,2778.93 ccw(c1834.58,2788.32) 1847.86,2788.32 ccw(c1861.14,2788.32) v1@1851.75,2778.93 ; v1(1847.86,2775.04) 1847.86,2814.13 EXTHDR1.20@1847.86,2859.25 ; v1(4965.19,3516.71) 4981.86,3516.71 ; v1@4973.36,3511.87 cw(c4981.86,3506.84) 4981.86,3516.71 ; v1@4973.36,3521.55 ccw(c4981.86,3526.58) 4981.86,3516.71 ; U8.AF5@5050.05,3692.57 cw(c5037.25,3679.77) 5055.35,3679.77 cw(c5073.46,3679.77) U8.AF5@5060.66,3692.57 ; U8.AF5@5050.16,3692.68 cw(c5037.63,3680.15) 5055.35,3680.15 cw(c5073.08,3680.15) U8.AF5@5060.55,3692.68 ; U8.AF5@5055.35,3697.87 5055.35,3670 5055.35,3660 5055.35,3621.17 5050,3615.81 5050,3560.92 5041,3551.92 5041,3542 5036.37,3537.37 5002.52,3537.37 4981.86,3516.71
  MidLayer1 w4: v1(2673.52,2866.71) 2916.95,2866.71 3056.86,3006.61 v1(3056.86,3241.71) ; v1@2677.41,2862.82 cw(c2686.8,2853.43) 2686.8,2866.71 cw(c2686.8,2879.99) v1@2677.41,2870.6 ; v1@2680.24,2859.99 cw(c2696.46,2843.77) 2696.46,2866.71 cw(c2696.46,2889.64) v1@2680.24,2873.43 ; v1@3050.14,3234.99 cw(c3033.92,3218.77) 3056.86,3218.77 cw(c3079.79,3218.77) v1@3063.57,3234.99 ; v1@3052.97,3237.82 cw(c3043.58,3228.43) 3056.86,3228.43 cw(c3070.14,3228.43) v1@3060.75,3237.82
  MidLayer2 w4: v1@3056.86,3232.21 cw(c3056.86,3209.27) 3073.07,3225.49 cw(c3089.29,3241.71) v1@3066.36,3241.71 ; v1@3056.86,3236.21 cw(c3056.86,3222.93) 3066.25,3232.32 cw(c3075.64,3241.71) v1@3062.36,3241.71 ; v1(3056.86,3241.71) 3081.52,3217.04 3292.84,3217.04 3334.17,3258.37 4206.86,3258.37 4306.86,3358.37 4540.19,3358.37 4565.19,3383.37 4623.52,3383.37 4631.86,3391.71 4729.88,3391.71 4745.21,3407.04 4869.88,3407.04 4899.52,3436.69 4899.52,3483.37 4906.86,3490.71 4906.86,3508.37 4912.86,3514.37 4956.86,3514.37 4959.19,3516.71 v1(4965.19,3516.71)
  Bottom Layer w4: v1(1847.86,2775.04) 2500.19,2775.04 2591.86,2866.71 v1(2673.52,2866.71) ; v1@1851.75,2771.15 cw(c1861.14,2761.76) 1861.14,2775.04 cw(c1861.14,2788.32) v1@1851.75,2778.93 ; v1@1854.57,2768.32 cw(c1870.79,2752.11) 1870.79,2775.04 cw(c1870.79,2797.98) v1@1854.57,2781.76 ; v1@2666.81,2859.99 ccw(c2650.59,2843.77) 2650.59,2866.71 ccw(c2650.59,2889.64) v1@2666.81,2873.43 ; v1@2669.64,2862.82 ccw(c2660.25,2853.43) 2660.25,2866.71 ccw(c2660.25,2879.99) v1@2669.64,2870.6
PBIO.D10: EXTHDR1.22 U8.AC2 | length 5268.3
  Top Layer w4: EXTHDR1.22@1810.7,2808.48 cw(c1797.05,2794.82) 1816.36,2794.82 cw(c1835.67,2794.82) EXTHDR1.22@1822.02,2808.48 ; EXTHDR1.22@1816.36,2859.25 1816.36,2682.2 v1(2006.86,2491.71) ; v1@1997.36,2491.71 ccw(c1974.42,2491.71) 1990.64,2507.93 ccw(c2006.86,2524.14) v1@2006.86,2501.21 ; v1@2001.36,2491.71 ccw(c1988.08,2491.71) 1997.47,2501.1 ccw(c2006.86,2510.49) v1@2006.86,2497.21 ; v1(4753.19,3691.71) 4775.39,3691.71 ; v1@4759.19,3691.71 4775.39,3691.71 ; 4766.04,3691.71 cw(c4766.04,3703.98) 4757.17,3695.51 ccw(c4766.04,3703.98) 4766.04,3691.71 ; 4766.04,3691.71 ccw(c4766.04,3679.44) 4757.17,3687.91 cw(c4766.04,3679.44) 4766.04,3691.71 ; 4775.39,3691.71 cw(c4775.39,3712.9) 4760.06,3698.27 ccw(c4775.39,3712.9) 4775.39,3691.71 ; 4775.39,3691.71 ccw(c4775.39,3670.51) 4760.06,3685.15 cw(c4775.39,3670.51) 4775.39,3691.71 ; 4775.39,3691.71 4782.73,3699.04 4805.25,3699.04 4806.86,3700.65 4806.86,3769.29 4838.04,3800.48 4860,3800.48 4870,3800.48 4917.53,3800.48 ; 4917.53,3800.48 ccw(c4917.53,3810.63) 4924.71,3803.45 ; 4917.53,3800.48 ccw(c4917.53,3810.63) 4924.71,3803.45 ; 4924.71,3803.45 ccw(c4912.17,3815.98) 4929.9,3815.98 cw(c4912.17,3815.98) 4924.71,3803.45 ; 4924.71,3803.45 cw(c4937.24,3790.92) 4937.24,3808.64 ccw(c4937.24,3790.92) 4924.71,3803.45
  MidLayer1 w4: v1(3359.19,2335.71) 3381.21,2335.71 ; v1@3363.19,2331.93 cw(c3371.94,2323.68) 3371.94,2335.71 cw(c3371.94,2347.73) v1@3363.19,2339.48 ; v1@3366.1,2329.19 cw(c3381.21,2314.94) 3381.21,2335.71 ; v1@3366.1,2342.23 ccw(c3381.21,2356.48) 3381.21,2335.71 ; v1@4068.47,3478.32 ccw(c4052.26,3462.11) 4052.26,3485.04 ccw(c4052.26,3507.98) v1@4068.47,3491.76 ; v1@4071.3,3481.15 ccw(c4061.91,3471.76) 4061.91,3485.04 ccw(c4061.91,3498.32) v1@4071.3,3488.93 ; v1@4073.52,3483.37 v1(4075.19,3485.04) 4011.5,3485.04 3714.86,3188.39 3714.86,2691.37 3714.86,2669.35 3381.21,2335.71
  MidLayer2 w4: v1(4075.19,3485.04) 4089.36,3499.21 4089.36,3538.62 4099.94,3549.21 4105.77,3549.21 4120,3563.43 4120,3612.15 4097.69,3634.46 4097.69,3648.96 4134.24,3685.51 4134.24,3770.76 ; v1@4746.47,3684.99 ccw(c4730.26,3668.77) 4730.26,3691.71 ccw(c4730.26,3714.64) v1@4746.47,3698.43 ; v1@4749.3,3687.82 ccw(c4739.91,3678.43) 4739.91,3691.71 ccw(c4739.91,3704.99) v1@4749.3,3695.6 ; v1(4753.19,3691.71) 4706.86,3691.71 4681.86,3666.71 4381.86,3666.71 4256.86,3791.71 4155.19,3791.71 ; 4134.24,3770.76 4155.19,3791.71 ; 4134.24,3770.76 4155.19,3791.71
  Bottom Layer w4: v1(2006.86,2491.71) 2075,2491.71 2121.71,2445 2773.29,2445 2973.37,2445 2994.43,2423.95 3078.87,2339.5 3288.65,2339.5 3317.65,2310.5 3358,2310.5 3359.19,2311.69 v1(3359.19,2335.71) v1@3353.08,2335.71 ; v1@2010.75,2487.82 cw(c2020.14,2478.43) 2020.14,2491.71 cw(c2020.14,2504.99) v1@2010.75,2495.6 ; v1@2013.57,2484.99 cw(c2029.79,2468.77) 2029.79,2491.71 cw(c2029.79,2514.64) v1@2013.57,2498.43 ; v1@3352.47,2328.99 cw(c3336.26,2312.77) 3359.19,2312.77 cw(c3382.13,2312.77) v1@3365.91,2328.99 ; v1@3355.3,2331.82 cw(c3345.91,2322.43) 3359.19,2322.43 cw(c3372.47,2322.43) v1@3363.08,2331.82
PBIO.D11: EXTHDR1.24 U8.AF4 | length 4168.6
  Top Layer w4: EXTHDR1.24@1780.06,2910.77 ccw(c1772.84,2920.38) 1784.87,2920.38 ; EXTHDR1.24@1784.87,2859.25 1784.87,2920.38 ; EXTHDR1.24@1789.67,2910.76 cw(c1796.89,2920.38) 1784.87,2920.38 ; v1(1798.52,2934.04) 1784.87,2920.38 ; v1(4930.86,3541.71) 4962.59,3541.71 4967.93,3536.37 4986.52,3536.37 4994.19,3544.04 4994.19,3562.91 5015.98,3584.71 5015.98,3660 5015.98,3670 U8.AF4@5015.98,3697.87 ; v1@4934.75,3537.82 cw(c4944.14,3528.43) 4944.14,3541.71 cw(c4944.14,3554.99) v1@4934.75,3545.6 ; v1@4937.57,3534.99 cw(c4953.79,3518.77) 4953.79,3541.71 cw(c4953.79,3564.64) v1@4937.57,3548.43 ; U8.AF4@5010.68,3692.57 cw(c4997.88,3679.77) 5015.98,3679.77 cw(c5034.09,3679.77) U8.AF4@5021.29,3692.57 ; U8.AF4@5010.79,3692.68 cw(c4998.26,3680.15) 5015.98,3680.15 cw(c5033.71,3680.15) U8.AF4@5021.18,3692.68
  MidLayer2 w4: v1(2390.86,3175.04) 2433.19,3217.37 2763.02,3217.37 2771.69,3208.71 2976.84,3208.71 3035.17,3267.04 3086.88,3267.04 3128.88,3225.04 3289.52,3225.04 3331.19,3266.71 4090.19,3266.71 4248.52,3425.04 4412.19,3425.04 4453.86,3383.37 4482.52,3383.37 4504.19,3405.04 4565.19,3405.04 4570.19,3400.04 4612.21,3400.04 4670.54,3458.37 4790.52,3458.37 4873.86,3541.71 v1(4930.86,3541.71) ; v1@2390.86,3180.54 ccw(c2390.86,3193.82) 2400.25,3184.43 ccw(c2409.64,3175.04) v1@2396.36,3175.04 ; v1@2390.86,3184.54 ccw(c2390.86,3207.48) 2407.07,3191.26 ccw(c2423.29,3175.04) v1@2400.36,3175.04 ; v1@4924.14,3534.99 ccw(c4907.92,3518.77) 4907.92,3541.71 ccw(c4907.92,3564.64) v1@4924.14,3548.43 ; v1@4926.97,3537.82 ccw(c4917.58,3528.43) 4917.58,3541.71 ccw(c4917.58,3554.99) v1@4926.97,3545.6
  Bottom Layer w4: v1(1798.52,2934.04) 1840.19,2975.71 1840.19,3025.04 1856.86,3041.71 2257.52,3041.71 v1(2390.86,3175.04) ; v1@1798.52,2939.54 ccw(c1798.52,2952.82) 1807.91,2943.43 ccw(c1817.3,2934.04) v1@1804.02,2934.04 ; v1@1798.52,2943.54 ccw(c1798.52,2966.48) 1814.74,2950.26 ccw(c1830.96,2934.04) v1@1808.02,2934.04 ; v1@2381.36,3175.04 cw(c2358.42,3175.04) 2374.64,3158.82 cw(c2390.86,3142.61) v1@2390.86,3165.54 ; v1@2385.36,3175.04 cw(c2372.08,3175.04) 2381.47,3165.65 cw(c2390.86,3156.26) v1@2390.86,3169.54
PBIO.D12: EXTHDR1.26 U8.AE4 | length 4692
  Top Layer w4: EXTHDR1.26@1747.71,2910.03 ccw(c1734.06,2923.68) 1753.37,2923.68 ccw(c1772.68,2923.68) EXTHDR1.26@1759.03,2910.03 ; v1@1750.14,2984.99 cw(c1733.92,2968.77) 1756.86,2968.77 cw(c1779.79,2968.77) v1@1763.57,2984.99 ; v1@1752.97,2987.82 cw(c1743.58,2978.43) 1756.86,2978.43 cw(c1770.14,2978.43) v1@1760.75,2987.82 ; EXTHDR1.26@1753.37,2859.25 1753.37,2951.51 1756.86,2955 v1(1756.86,2991.71) ; v1(4973.52,3555.37) 4973.52,3570.37 5000.48,3597.33 5000.48,3660 5000.48,3670 5000.48,3717.53 ; 5000.48,3717.53 cw(c5010.63,3717.53) 5003.45,3724.71 ; 5000.48,3717.53 cw(c5010.63,3717.53) 5003.45,3724.71 ; 5003.45,3724.71 cw(c5015.98,3712.17) 5015.98,3729.9 ccw(c5015.98,3712.17) 5003.45,3724.71 ; 5003.45,3724.71 ccw(c4990.92,3737.24) 5008.64,3737.24 cw(c4990.92,3737.24) 5003.45,3724.71
  MidLayer2 w4: v1@1747.36,2991.71 ccw(c1724.42,2991.71) 1740.64,3007.93 ccw(c1756.86,3024.14) v1@1756.86,3001.21 ; v1@1751.36,2991.71 ccw(c1738.08,2991.71) 1747.47,3001.1 ccw(c1756.86,3010.49) v1@1756.86,2997.21 ; v1(1756.86,2991.71) 1715,3033.56 1676.7,3033.56 1568.17,2925.04 1556.86,2925.04 1547.52,2934.37 1547.52,2935 1527.92,2954.6 1525.65,2954.6 1515.4,2964.85 1515.4,3085.4 1530.37,3100.37 2207.19,3100.37 2223.52,3116.71 2617.56,3116.71 2625.9,3108.37 3151.51,3108.37 3209.84,3166.71 4265.19,3166.71 4341.86,3243.37 4390.19,3243.37 4405.19,3258.37 4577.19,3258.37 4656.86,3338.04 4742.86,3338.04 4756.86,3324.04 4805,3324.04 4814.19,3324.04 4819.54,3324.04 4923.52,3428.02 4923.52,3433.37 4923.52,3447.37 4987.19,3511.04 4987.19,3541.71 v1(4973.52,3555.37)
PBIO.D13: EXTHDR1.28 U8.AF3 | length 5285.8
  Top Layer w4: EXTHDR1.28@1716.22,2808.48 cw(c1702.56,2794.82) 1721.87,2794.82 cw(c1741.19,2794.82) EXTHDR1.28@1727.53,2808.48 ; EXTHDR1.28@1721.87,2859.25 1721.87,2750.36 v1(2013.86,2458.37) ; v1@2004.36,2458.37 ccw(c1981.42,2458.37) 1997.64,2474.59 ccw(c2013.86,2490.81) v1@2013.86,2467.87 ; v1@2008.36,2458.37 ccw(c1995.08,2458.37) 2004.47,2467.76 ccw(c2013.86,2477.15) v1@2013.86,2463.87 ; v1@4876.05,3529.9 ccw(c4866.94,3541.71) 4881.86,3541.71 ; v1(4881.86,3522.37) 4881.86,3541.71 ; v1@4887.66,3529.9 cw(c4896.78,3541.71) 4881.86,3541.71 ; U8.AF3@4971.31,3692.57 cw(c4958.51,3679.77) 4976.61,3679.77 cw(c4994.72,3679.77) U8.AF3@4981.92,3692.57 ; U8.AF3@4971.42,3692.68 cw(c4958.89,3680.15) 4976.61,3680.15 cw(c4994.34,3680.15) U8.AF3@4981.81,3692.68 ; U8.AF3@4976.61,3697.87 4976.61,3670 4976.61,3660 4976.61,3655.26 4976.61,3633.7 4982.69,3627.62 4982.69,3609.19 4948.21,3574.71 4914.86,3574.71 4907.26,3567.11 4881.86,3541.71
  MidLayer1 w4: v1@4876.14,2465.09 ccw(c4842.22,2499.01) 4890.19,2499.01 ; v1@4878.97,2462.26 ccw(c4851.88,2489.36) 4890.19,2489.36 ; v1@4881.8,2459.44 ccw(c4861.53,2479.7) 4890.19,2479.7 ; v1@4881.86,3512.87 cw(c4881.86,3489.94) 4898.07,3506.16 cw(c4914.29,3522.37) v1@4891.36,3522.37 ; v1@4881.86,3516.87 cw(c4881.86,3503.6) 4891.25,3512.99 cw(c4900.64,3522.37) v1@4887.36,3522.37 ; v1(4881.86,3522.37) 4899.52,3504.71 4899.52,3432.37 4948.52,3383.37 4948.52,3231 4915,3197.48 4915,3175 ; v1(4882.86,2458.37) 4890.19,2465.71 4890.19,2650.04 4915.19,2675.04 4915.19,3175 ; v1@4884.62,2456.61 ccw(c4871.19,2470.04) 4890.19,2470.04
  MidLayer2 w4: v1@2013.86,2448.87 cw(c2013.86,2425.94) 2030.07,2442.16 cw(c2046.29,2458.37) v1@2023.36,2458.37 ; v1@2013.86,2452.87 cw(c2013.86,2439.6) 2023.25,2448.99 cw(c2032.64,2458.37) v1@2019.36,2458.37 ; v1(2013.86,2458.37) 2080.86,2391.37 2417.32,2391.37 2450.65,2358.04 2734.35,2358.04 2742.81,2366.5 2777.19,2366.5 2785.65,2358.04 3093.04,2358.04 3126.37,2391.37 4688,2391.37 4755,2458.37 v1(4882.86,2458.37) ; v1@4876.14,2451.66 ccw(c4859.92,2435.44) 4859.92,2458.37 ccw(c4859.92,2481.31) v1@4876.14,2465.09 ; v1@4878.97,2454.49 ccw(c4869.58,2445.1) 4869.58,2458.37 ccw(c4869.58,2471.65) v1@4878.97,2462.26
PBIO.D14: EXTHDR1.30 U8.AB1 | length 5798.3
  Top Layer w4: EXTHDR1.30@1686.52,2807.13 cw(c1675.32,2786.8) v1@1698.52,2786.8 ; EXTHDR1.30@1688.45,2810.63 cw(c1679.05,2793.57) v1@1698.52,2793.57 ; EXTHDR1.30@1690.38,2814.13 cw(c1682.78,2800.34) 1698.52,2800.34 ; EXTHDR1.30@1690.38,2859.25 1690.38,2813.15 1698.52,2805 v1(1698.52,2788.04) ; EXTHDR1.30@1693.08,2806.6 cw(c1694.68,2802.14) 1698.03,2805.49 cw(c1700.85,2808.31) EXTHDR1.30@1697.37,2810.24 ; v1@1693.56,2796.14 ccw(c1688.14,2805) 1698.52,2805 ccw(c1708.91,2805) v1@1703.49,2796.14 ; v1(2931.86,3039.37) 3099.37,3039.37 3181.86,3121.86 v1(3181.86,3283.37) ; v1@2935.75,3035.49 cw(c2945.14,3026.1) 2945.14,3039.37 cw(c2945.14,3052.65) v1@2935.75,3043.26 ; v1@2938.57,3032.66 cw(c2954.79,3016.44) 2954.79,3039.37 cw(c2954.79,3062.31) v1@2938.57,3046.09 ; v1@3175.14,3276.66 cw(c3158.92,3260.44) 3181.86,3260.44 cw(c3204.79,3260.44) v1@3188.57,3276.66 ; v1@3177.97,3279.49 cw(c3168.58,3270.1) 3181.86,3270.1 cw(c3195.14,3270.1) v1@3185.75,3279.49 ; v1@4707.81,3674.43 ccw(c4691.59,3690.64) 4714.52,3690.64 ccw(c4737.46,3690.64) v1@4721.24,3674.43 ; v1@4710.64,3671.6 ccw(c4701.25,3680.99) 4714.52,3680.99 ccw(c4727.8,3680.99) v1@4718.41,3671.6 ; v1(4714.52,3667.71) 4714.52,3704.6 4734.81,3724.88 4734.81,3740.19 4727.93,3747.07 4722.93,3747.07 4688.52,3781.48 4688.52,3810.9 4732.98,3855.35 4860,3855.35 4870,3855.35 U8.AB1@4897.87,3855.35 ; U8.AB1@4892.57,3850.05 ccw(c4879.77,3837.25) 4879.77,3855.35 ccw(c4879.77,3873.46) U8.AB1@4892.57,3860.66 ; U8.AB1@4892.68,3850.16 ccw(c4880.15,3837.63) 4880.15,3855.35 ccw(c4880.15,3873.08) U8.AB1@4892.68,3860.55
  MidLayer2 w4: v1@3940.19,3498.87 cw(c3940.19,3475.94) 3956.41,3492.16 cw(c3972.63,3508.37) v1@3949.69,3508.37 ; v1@3940.19,3502.87 cw(c3940.19,3489.6) 3949.58,3498.99 cw(c3958.97,3508.37) v1@3945.69,3508.37 ; v1(3940.19,3508.37) 4006.86,3441.71 4015.19,3441.71 4048.52,3408.37 4073.52,3408.37 4131.86,3466.71 4131.86,3516.71 4148.52,3533.37 4173.52,3533.37 4215.19,3575.04 4215.19,3708.37 4173.52,3750.04 4173.52,3758.37 4198.52,3783.37 4251.52,3783.37 4376.52,3658.37 4706.52,3658.37 v1@4715.19,3667.04
  Bottom Layer w4: v1(1698.52,2788.04) 1735,2824.52 1735,3020.04 1765,3050.04 2085,3050.04 2244,3209.04 2721.35,3209.04 2930.69,2999.71 3106.52,2999.71 3123.52,3016.71 3123.52,3048.37 3121.86,3050.04 3030,3050.04 3020.41,3040.45 2932.93,3040.45 v1(2931.86,3039.37) ; v1@1698.52,2793.54 ccw(c1698.52,2806.82) 1707.91,2797.43 ccw(c1717.3,2788.04) v1@1704.02,2788.04 ; v1@1698.52,2797.54 ccw(c1698.52,2820.48) 1714.74,2804.26 ccw(c1730.96,2788.04) v1@1708.02,2788.04 ; v1@2935.75,3035.49 cw(c2947.73,3023.5) 2947.73,3040.45 ; v1@2938.57,3032.66 cw(c2957.38,3013.85) 2957.38,3040.45 ; v1@2938.57,3046.09 ccw(c2952.2,3059.72) 2952.2,3040.45 ; v1(3181.86,3283.37) 3198.86,3300.37 3935.86,3300.37 3956.86,3321.37 3969.86,3321.37 3990.19,3341.71 3990.19,3458.37 v1(3940.19,3508.37) ; v1@3181.86,3288.87 ccw(c3181.86,3302.15) 3191.25,3292.76 ccw(c3200.64,3283.37) v1@3187.36,3283.37 ; v1@3181.86,3292.87 ccw(c3181.86,3315.81) 3198.07,3299.59 ccw(c3214.29,3283.37) v1@3191.36,3283.37 ; v1@3940.19,3498.87 cw(c3940.19,3475.94) 3956.41,3492.16 cw(c3972.63,3508.37) v1@3949.69,3508.37 ; v1@3940.19,3502.87 cw(c3940.19,3489.6) 3949.58,3498.99 cw(c3958.97,3508.37) v1@3945.69,3508.37
PBIO.D15: EXTHDR1.32 U8.AA7 | length 4675
  Top Layer w4: EXTHDR1.32@1653.92,2910.65 ccw(c1649.13,2916.71) 1656.86,2916.71 ; EXTHDR1.32@1656.86,2883.37 1656.86,2916.71 ; EXTHDR1.32@1660.52,2912.2 cw(c1661.46,2916.71) 1656.86,2916.71 ; v1@1672.36,2941.71 cw(c1649.42,2941.71) 1665.64,2925.49 cw(c1681.86,2909.27) v1@1681.86,2932.21 ; v1@1676.36,2941.71 cw(c1663.08,2941.71) 1672.47,2932.32 cw(c1681.86,2922.93) v1@1681.86,2936.21 ; v1(1681.86,2941.71) 1656.86,2916.71 ; v3(5114.41,3875.04) U8.AA7@5134.09,3894.72 ; U8.AA7@5126.59,3894.72 cw(c5108.49,3894.72) 5121.29,3881.92 cw(c5134.09,3869.12) U8.AA7@5134.09,3887.22 ; U8.AA7@5126.75,3894.72 cw(c5109.03,3894.72) 5121.56,3882.19 cw(c5134.09,3869.66) U8.AA7@5134.09,3887.38 ; 5127.21,3887.84 cw(c5114.41,3900.65) 5114.41,3882.54 ccw(c5114.41,3900.65) 5127.21,3887.84 ; 5127.21,3887.84 ccw(c5140.02,3875.04) 5121.91,3875.04 cw(c5140.02,3875.04) 5127.21,3887.84
  MidLayer1 w4: v1(4956.86,3166.71) 4956.86,3175.04 4972.86,3191.04 ; v1@4958.33,3167.01 cw(c4972.9,3170.03) 4962.38,3180.56 ; v1@4962.24,3167.82 cw(c4981.58,3171.83) 4967.62,3185.8 ; v1@4966.16,3168.64 cw(c4990.26,3173.63) 4972.86,3191.04 ; 5090.55,3798.23 5090.55,3812.16 ; v3@5107.02,3873.74 cw(c5089.19,3870.59) 5104.02,3860.21 ; v3@5115.71,3867.65 ccw(c5118.86,3849.82) 5104.02,3860.21 ; 4972.86,3191.04 4972.86,3383.04 5040.19,3450.37 5040.19,3551.67 5052,3563.48 5052,3600.52 5061.43,3609.95 5079,3627.52 5090.55,3639.06 5090.55,3660 5090.55,3670 5090.55,3718.62 5090.55,3738.04 5090.55,3812.16 ; 5090.55,3812.16 5090.55,3835.41 cw(c5114.32,3835.41) 5096.94,3851.63 5104.02,3860.21
  MidLayer2 w4: v1(1681.86,2941.71) 1743.29,2941.71 1768.63,2916.37 1881.37,2916.37 1919.41,2954.41 1952.49,2954.41 1998.52,2908.37 2031.86,2908.37 2081.86,2958.37 3290.19,2958.37 3298.52,2966.71 4505.88,2966.71 4572.54,3033.37 4823.52,3033.37 v1(4956.86,3166.71) ; v1@1685.75,2937.82 cw(c1695.14,2928.43) 1695.14,2941.71 cw(c1695.14,2954.99) v1@1685.75,2945.6 ; v1@1688.57,2934.99 cw(c1704.79,2918.77) 1704.79,2941.71 cw(c1704.79,2964.64) v1@1688.57,2948.43 ; v1@4947.36,3166.71 cw(c4924.42,3166.71) 4940.64,3150.49 cw(c4956.86,3134.27) v1@4956.86,3157.21 ; v1@4951.36,3166.71 cw(c4938.08,3166.71) 4947.47,3157.32 cw(c4956.86,3147.93) v1@4956.86,3161.21
PBIO.D16: EXTHDR1.34 U8.Y5 | length 6037.2
  Top Layer w4: EXTHDR1.34@1621.73,2808.48 cw(c1608.07,2794.82) 1627.39,2794.82 cw(c1646.7,2794.82) EXTHDR1.34@1633.04,2808.48 ; EXTHDR1.34@1627.39,2859.25 1627.39,2721.18 v1(1756.86,2591.71) ; v1@1747.36,2591.71 ccw(c1724.42,2591.71) 1740.64,2607.93 ccw(c1756.86,2624.14) v1@1756.86,2601.21 ; v1@1751.36,2591.71 ccw(c1738.08,2591.71) 1747.47,2601.1 ccw(c1756.86,2610.49) v1@1756.86,2597.21 ; v3(5035.67,3914.41) U8.Y5@5055.35,3934.09 ; U8.Y5@5047.85,3934.09 cw(c5029.75,3934.09) 5042.55,3921.29 cw(c5055.35,3908.49) U8.Y5@5055.35,3926.59 ; U8.Y5@5048.01,3934.09 cw(c5030.29,3934.09) 5042.82,3921.56 cw(c5055.35,3909.03) U8.Y5@5055.35,3926.75 ; 5048.47,3927.21 cw(c5035.67,3940.02) 5035.67,3921.91 ccw(c5035.67,3940.02) 5048.47,3927.21 ; 5048.47,3927.21 ccw(c5061.28,3914.41) 5043.17,3914.41 cw(c5061.28,3914.41) 5048.47,3927.21
  MidLayer1 w4: v1@3891.81,2873.43 ccw(c3875.59,2889.64) 3898.52,2889.64 ccw(c3921.46,2889.64) v1@3905.24,2873.43 ; v1@3894.64,2870.6 ccw(c3885.25,2879.99) 3898.52,2879.99 ccw(c3911.8,2879.99) v1@3902.41,2870.6 ; v1(3898.52,2866.71) 3898.52,2944.08 4272.52,3318.08 4272.52,3983.2 4356.03,4066.71 4515.19,4066.71 4531.86,4050.04 4531.86,4041.71 4498.52,4008.37 4498.52,3983.37 4515.19,3966.71 4647.52,3966.71 4669.52,3944.71 4669.52,3670.71 4681.86,3658.37 4681.86,3624.04 4697.52,3608.37 4723.52,3608.37 4773.52,3658.37 4773.52,3700.04 4790.19,3716.71 4790.19,3751.71 4783.52,3758.37 4783.52,3888.52 4793.9,3898.9 4860,3898.9 4870,3898.9 4918.62,3898.9 5012.16,3898.9 ccw(c5012.16,3912.95) 5022.09,3903.02 ; v3@5028.2,3915.06 cw(c5010.16,3916.64) 5021.8,3902.77 cw(c5033.44,3888.9) v3@5035.02,3906.94
  Bottom Layer w4: v1@1750.14,2598.43 ccw(c1733.92,2614.64) 1756.86,2614.64 ccw(c1779.79,2614.64) v1@1763.57,2598.43 ; v1@1752.97,2595.6 ccw(c1743.58,2604.99) 1756.86,2604.99 ccw(c1770.14,2604.99) v1@1760.75,2595.6 ; v1(1756.86,2591.71) 1756.86,2646.86 1785.71,2675.71 2164.69,2675.71 2206.69,2633.71 2991.29,2633.71 3008.29,2616.71 3023.52,2616.71 3031.86,2625.04 3198.52,2625.04 3206.86,2616.71 3248.29,2616.71 3255.19,2623.61 3255.19,2635.04 3248.52,2641.71 3248.52,2677.04 3256.86,2685.37 3288.52,2685.37 3294.19,2679.71 3319.86,2679.71 3327.68,2687.53 3355,2714.85 3355,2855 3426.37,2926.37 3838.86,2926.37 v1(3898.52,2866.71) ; v1@3889.02,2866.71 ccw(c3866.09,2866.71) 3882.31,2882.93 ccw(c3898.52,2899.14) v1@3898.52,2876.21 ; v1@3893.02,2866.71 ccw(c3879.75,2866.71) 3889.14,2876.1 ccw(c3898.52,2885.49) v1@3898.52,2872.21